# Altium PCB 24V-7A-Power-Board-v1.0.PcbDoc (part 2 of 4)
Units mil, origin at the board's own origin, x right, y up, seen from the top; angles counter-clockwise.
Board outline 6000 x 4000 mil, 2 copper layers (Top Layer, Bottom Layer); 157 components, 80 nets, 383 pads, 0 vias.
Unrouted connection lines stored in the file: 290.
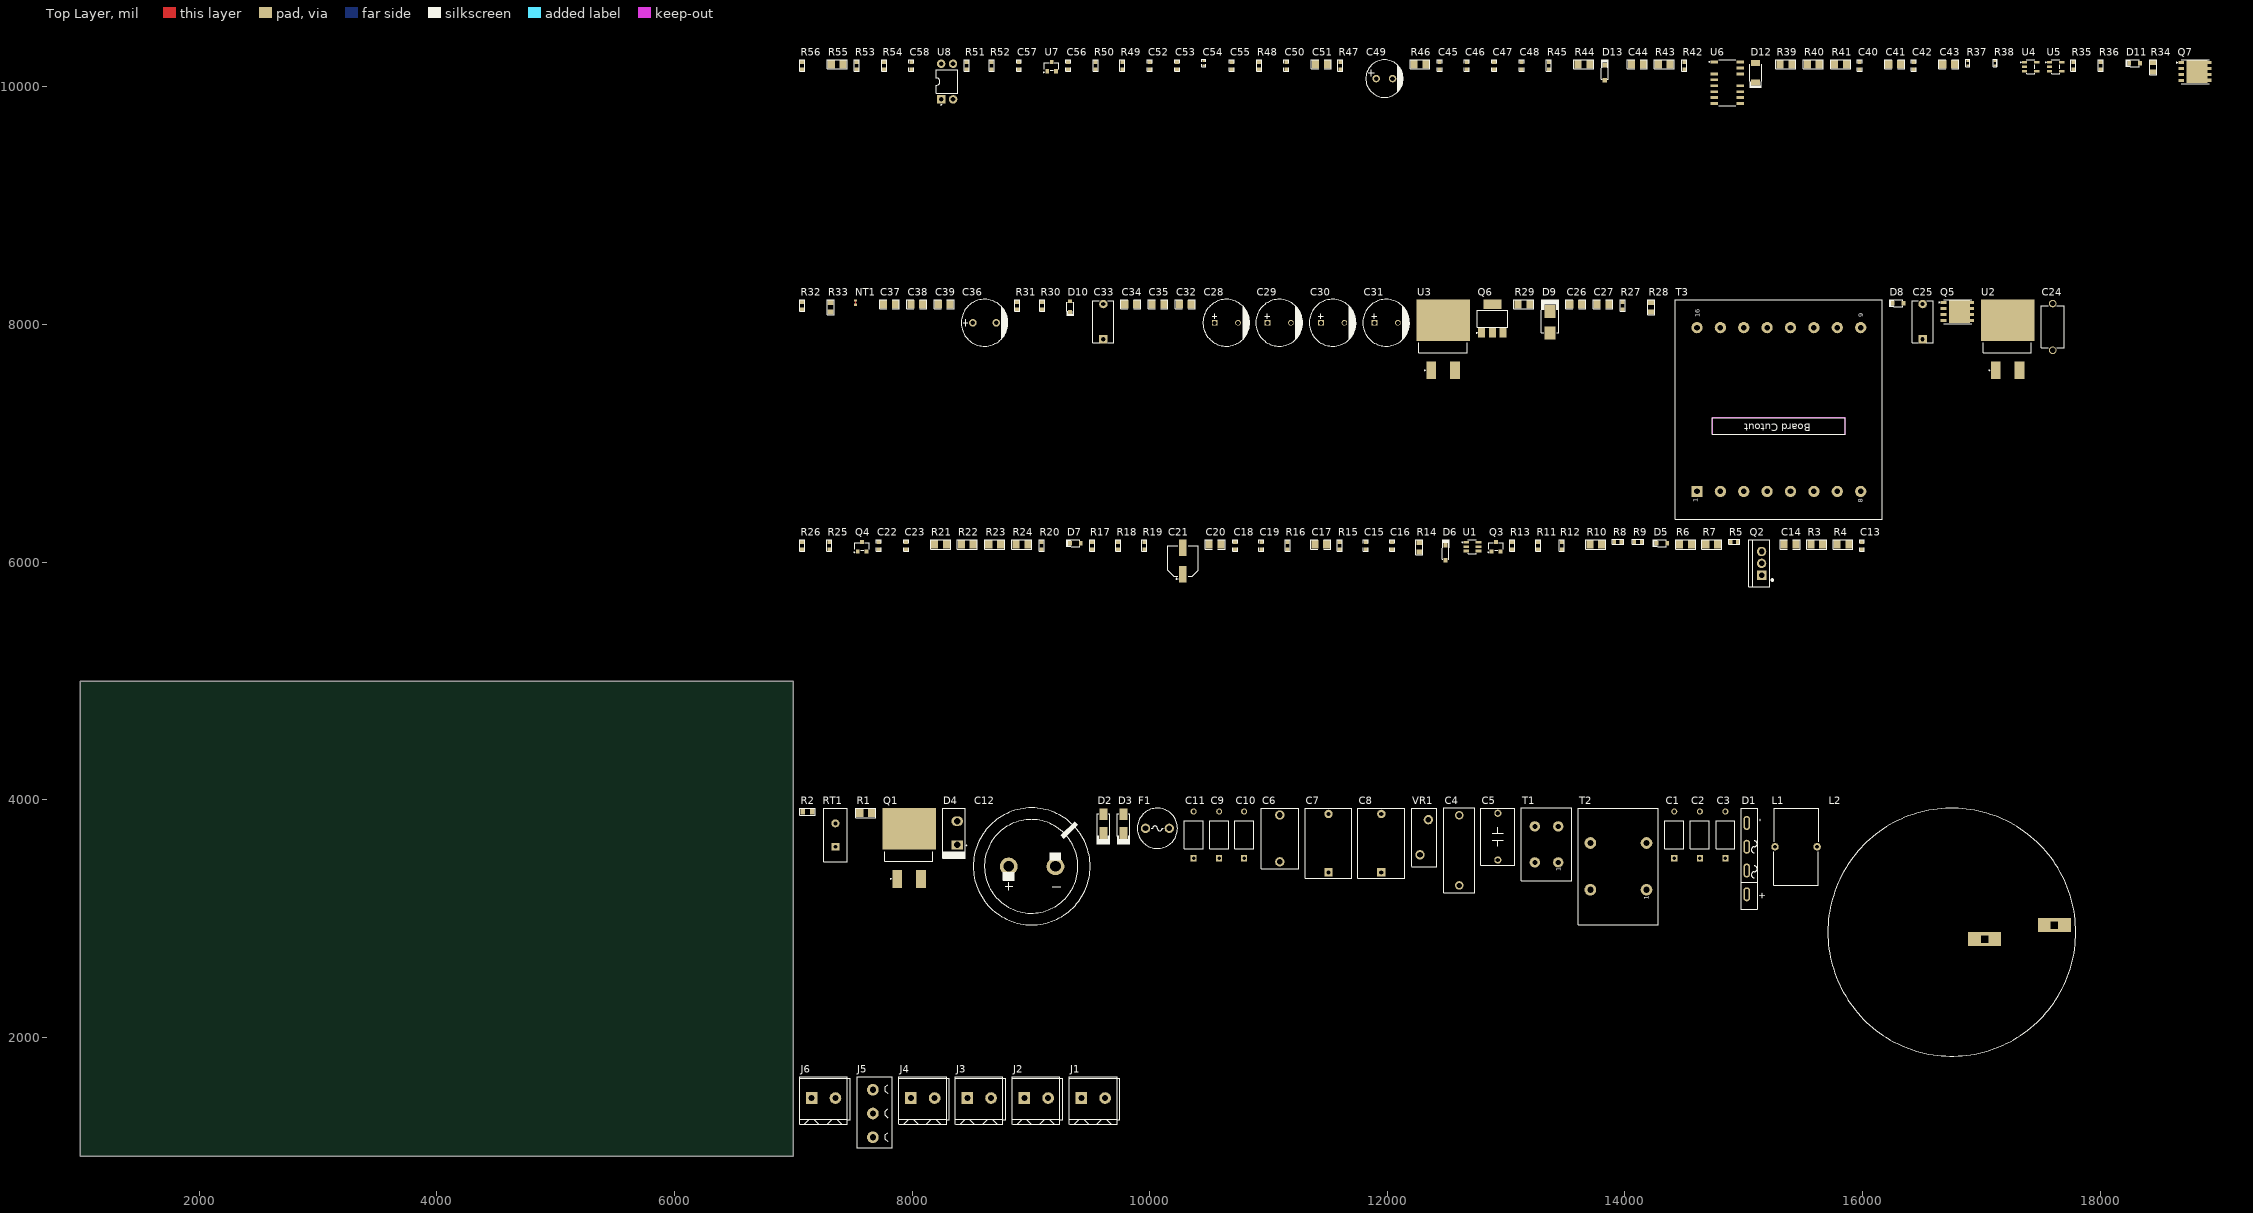
[diagram p0: Top Layer view]

## Part data (continued)
C34: library part GRM31A5C2J151JW01D, "CAP CER 150PF 630V C0G/NP0 1206", LCSC Part Number=C162445, Manufacturer=Murata, ComponentLink1Description=https://datasheet.ciiva.com/138/partnumbering-e-01-138796.pdf?src-supplier=Digikey, ComponentLink1URL=https://datasheet.ciiva.com/138/partnumbering-e-01-138796.pdf?src-supplier=Digikey, ComponentLink2Description=https://datasheet.ciiva.com/138/partnumbering-e-01-138797.pdf?src-supplier=Digikey, ComponentLink2URL=https://datasheet.ciiva.com/138/partnumbering-e-01-138797.pdf?src-supplier=Digikey, ComponentLink3Description=https://datasheet.ciiva.com/138/partnumbering-e-01-138798.pdf?src-supplier=Digikey, ComponentLink3URL=https://datasheet.ciiva.com/138/partnumbering-e-01-138798.pdf?src-supplier=Digikey, ComponentLink4Description=https://datasheet.ciiva.com/13240/c02e-2905-13240518.pdf?src-supplier=Mouser, ComponentLink4URL=https://datasheet.ciiva.com/13240/c02e-2905-13240518.pdf?src-supplier=Mouser, Item Type=Capacitor, Manufacturer Part Number=GRM31A5C2J151JW01D, Pricing="1=0.35, 10=0.194, 50=0.194, 100=0.12, 1000=0.1, 10000=0.08 (USD)", RoHS=Yes, Stock=4361, Supplier=Mouser
C35: library part GRM31A5C3A101JW01D, "CAP CER 100PF 1KV 5% NP0 1206", LCSC Part Number=C162451, Manufacturer=Murata, ComponentLink1Description=https://datasheet.ciiva.com/29535/partnumbering-e-01-29535608.pdf?src-supplier=Digikey, ComponentLink1URL=https://datasheet.ciiva.com/29535/partnumbering-e-01-29535608.pdf?src-supplier=Digikey, ComponentLink2Description=https://datasheet.ciiva.com/7829/1666664-7829029.pdf?src-supplier=Element14, ComponentLink2URL=https://datasheet.ciiva.com/7829/1666664-7829029.pdf?src-supplier=Element14, Item Type=Capacitor, Manufacturer Part Number=GRM31A5C3A101JW01D, Pricing="4000=0.0742, 8000=0.0723, 12000=0.0712, 16000=0.0704, 20000=0.068 (USD)", RoHS=Yes, Stock=4000, Supplier="Future Electronics"
C36: library part EEU-FR1V471B, "CAP ALUM 470UF 20% 35V RADIAL", LCSC Part Number=C713403, Leakage Current=164.5uA, Manufacturer=Panasonic, ComponentLink1Description=https://datasheet.ciiva.com/43469/1653413-43469590.pdf?src-supplier=Farnell, ComponentLink1URL=https://datasheet.ciiva.com/43469/1653413-43469590.pdf?src-supplier=Farnell, ComponentLink2Description=https://datasheet.ciiva.com/11678/aba0000ce132-11678063.pdf?src-supplier=Avnet, ComponentLink2URL=https://datasheet.ciiva.com/11678/aba0000ce132-11678063.pdf?src-supplier=Avnet, ComponentLink3Description=https://datasheet.ciiva.com/46371/1653413-46371772.pdf?src-supplier=Element14, ComponentLink3URL=https://datasheet.ciiva.com/46371/1653413-46371772.pdf?src-supplier=Element14, ComponentLink4Description=https://datasheet.ciiva.com/7805/1725490-7805503.pdf?src-supplier=Element14, ComponentLink4URL=https://datasheet.ciiva.com/7805/1725490-7805503.pdf?src-supplier=Element14, ComponentLink5Description=https://datasheet.ciiva.com/30252/9aba0000ce132-30252342.pdf?src-supplier=Onlinecomponents.com, ComponentLink5URL=https://datasheet.ciiva.com/30252/9aba0000ce132-30252342.pdf?src-supplier=Onlinecomponents.com, ComponentLink6Description=https://datasheet.ciiva.com/16387/aba0000ce132-16387061.pdf?src-supplier=Future+Electronics, ComponentLink6URL=https://datasheet.ciiva.com/16387/aba0000ce132-16387061.pdf?src-supplier=Future+Electronics, ComponentLink7Description=https://datasheet.ciiva.com/14602/70257620-14602201.pdf?src-supplier=Allied+Electronics, ComponentLink7URL=https://datasheet.ciiva.com/14602/70257620-14602201.pdf?src-supplier=Allied+Electronics, ComponentLink8Description=https://datasheet.ciiva.com/29247/448536-da-01-en-alu-kondensator-fr-r-470-uf-35v-500st-29247995.pdf?src-supplier=Conrad, ComponentLink8URL=https://datasheet.ciiva.com/29247/448536-da-01-en-alu-kondensator-fr-r-470-uf-35v-500st-29247995.pdf?src-supplier=Conrad, Item Type=Capacitor, Lead Free=5697LeadFree, Manufacturer Part Number=EEU-FR1V471B, Pins=2NUMBER, Pricing="1=0.78, 10=0.461, 50=0.461, 100=0.375, 1000=0.263, 10000=0.23 (USD)", RoHS=Yes, Stock=21799, Supplier=Mouser
C37: library part CC1206KKX5R9BB225, "CAP CER 2.2UF 50V X5R 1206", Case Code (Imperial)=1206, Case Code (Metric)=3216, Dielectric=X5R, LCSC Part Number=C577210, Manufacturer=Yageo, Max Operating Temperature=85°C, Min Operating Temperature=-55°C, Package Quantity=2000, Tolerance=10%, Voltage Rating=50V, Case/Package=1206, ComponentLink1Description=http://www.mouser.com/ds/2/447/Yageo_UPY-GP_NP0_16V-to-50V_9-358835.pdf?src-supplier=Mouser, ComponentLink1URL=http://www.mouser.com/ds/2/447/Yageo_UPY-GP_NP0_16V-to-50V_9-358835.pdf?src-supplier=Mouser, ComponentLink2Description=http://www.yageo.com/documents/recent/UPY-GPHC_X5R_4V-to-50V_25.pdf?src-supplier=Digikey, ComponentLink2URL=http://www.yageo.com/documents/recent/UPY-GPHC_X5R_4V-to-50V_25.pdf?src-supplier=Digikey, Halogen Free="Halogen Free", Height=1.45mm, Item Type=Capacitor, Lead Free="Lead Free", Length=0.126inch, Manufacturer Part Number=CC1206KKX5R9BB225, Material=4241ConductorMaterial, Mounting Technology="Surface Mount", Packaging="Tape and Reel", Pricing="1=0.59, 10=0.395, 50=0.3144, 100=0.2597, 500=0.20286, 1000=0.17244 (USD)", RoHS=Yes, RoHS Compliant=Yes, Series=CC, Stock=4588, Supplier=Digikey, Termination=SMD/SMT, Thickness=0.071inch, Voltage Rating (DC)=50V, Weight=0.000571oz, Width=0.063inch
C40 C42: library part CC0603KRX5R8BB225, "CAP CER 2.2UF 25V X5R 0603", Case Code (Imperial)=0603, Case Code (Metric)=1608, Dielectric=X5R, LCSC Part Number=C309478, Manufacturer=Yageo, Max Operating Temperature=85°C, Min Operating Temperature=-55°C, Package Quantity=4000, Resistor Type=Ceramic, Supplier Part Number 1=311-1786-1-ND, Tolerance=10%, Voltage Rating=25V, Capacitance=2.2uF, Case/Package=0603, ComponentLink1Description=https://www.verical.com/server-webapp/html/getDatasheet?partID=782757&src-supplier=Verical, ComponentLink1URL=https://www.verical.com/server-webapp/html/getDatasheet?partID=782757&src-supplier=Verical, Depth=0.8mm, Halogen Free="Halogen Free", Item Type=Capacitor, Lead Free="Lead Free", Length=1.6mm, Manufacturer Part Number=CC0603KRX5R8BB225, Mount="Surface Mount", Packaging="Tape and Reel", Pricing 1="1=0.4, 10=0.276, 50=0.1932, 100=0.1656, 500=0.1242, 1000=0.10488 (USD)", Radiation Hardening=No, RoHS Compliant=Yes, Stock 1=687936, Supplier 1=Digi-Key, Termination=SMD/SMT, Thickness=0.037inch, Voltage Rating (DC)=25V, Weight=7.1E-05oz, Width=0.031inch
C44: library part CC1206KKX7R7BB225, "CAP CER 2.2UF 16V X7R 1206", LCSC Part Number=C107183, Manufacturer=Yageo, ComponentLink1Description=https://datasheet.ciiva.com/11788/0900766b80d84f1d-11788402.pdf?src-supplier=Rs, ComponentLink1URL=https://datasheet.ciiva.com/11788/0900766b80d84f1d-11788402.pdf?src-supplier=Rs, ComponentLink2Description=https://datasheet.ciiva.com/11466/upy-gphc-x7r-6-3v-to-50v-8-11466572.pdf?src-supplier=Avnet, ComponentLink2URL=https://datasheet.ciiva.com/11466/upy-gphc-x7r-6-3v-to-50v-8-11466572.pdf?src-supplier=Avnet, ComponentLink3Description=https://datasheet.ciiva.com/5425/upy-gphc-x7r-6-3v-to-50v-8-12304-5425499.pdf?src-supplier=Mouser, ComponentLink3URL=https://datasheet.ciiva.com/5425/upy-gphc-x7r-6-3v-to-50v-8-12304-5425499.pdf?src-supplier=Mouser, Item Type=Capacitors, Manufacturer Part Number=CC1206KKX7R7BB225, Material=4241ConductorMaterial, Pricing="1=0.22, 10=0.144, 50=0.1012, 100=0.0817, 500=0.06072, 1000=0.05312 (USD)", RoHS=Yes, Stock=202610, Supplier=Digikey
C45 C46 C47: library part CC0603KRX5R7BB475, "CAP CER 4.7UF 16V X5R 0603", Case Code (Imperial)=0603, Case Code (Metric)=1608, Dielectric=X5R, LCSC Part Number=C277476, Manufacturer=Yageo, Max Operating Temperature=85°C, Min Operating Temperature=-55°C, Resistor Type=Ceramic, Supplier Part Number 1=311-1785-1-ND, Tolerance=10%, Voltage Rating=16V, Capacitance=4.7uF, Case/Package=0603, Category="Ceramic Capacitors", ComponentLink1Description=http://www.mouser.com/ds/2/447/UPY-GPHC_X5R_4V-to-50V_25-1131599.pdf?src-supplier=Mouser, ComponentLink1URL=http://www.mouser.com/ds/2/447/UPY-GPHC_X5R_4V-to-50V_25-1131599.pdf?src-supplier=Mouser, ComponentLink2Description=http://www.yageo.com/documents/recent/UPY-GPHC_X5R_4V-to-50V_25.pdf?src-supplier=Digi-Key, ComponentLink2URL=http://www.yageo.com/documents/recent/UPY-GPHC_X5R_4V-to-50V_25.pdf?src-supplier=Digi-Key, Depth=0.8mm, Halogen Free="Halogen Free", Height=0.8mm, Item Type=Capacitor, Lead Free="Lead Free", Length=1.6mm, Manufacturer Part Number=CC0603KRX5R7BB475, Mount="Surface Mount", Packaging="Tape and Reel", Pricing 1="1=0.20000, 10=0.13800, 50=0.08280, 100=0.06990, 500=0.04784, 1000=0.04233 (USD)", RoHS=Yes, RoHS Compliant=Yes, Series=CC, Stock 1=547703, Supplier 1=Digi-Key, Termination=SMD/SMT, Thickness=0.037inch, Voltage Rating (DC)=16V, Weight=7.1E-05oz, Width=0.8mm
C48: library part GRM1885C1H103JA01D, "CAP CER 10000PF 50V C0G/NP0 0603", Capacitance=10nF, Case Code (Imperial)=0603, Case Code (Metric)=1608, Dielectric=C0G, Manufacturer=Murata, Max Operating Temperature=125°C, Min Operating Temperature=-55°C, Package Quantity=4000, Supplier Part Number 1=1449032, Tolerance=5%, Voltage=50V, Case/Package=0603, Category="Ceramic Capacitors", ComponentLink1Description=https://datasheet.ciiva.com/41860/partnumbering-e-01-41860759.pdf?src-supplier=Digi-Key, ComponentLink1URL=https://datasheet.ciiva.com/41860/partnumbering-e-01-41860759.pdf?src-supplier=Digi-Key, ComponentLink2Description=https://datasheet.ciiva.com/29537/partnumbering-e-01-29537910.pdf?src-supplier=Digi-Key, ComponentLink2URL=https://datasheet.ciiva.com/29537/partnumbering-e-01-29537910.pdf?src-supplier=Digi-Key, Depth=0.8mm, Height=0.8mm, Lead Free="Lead Free", Lead Pitch=0.5mm, Length=1.6mm, Manufacturer Part Number=GRM1885C1H103JA01D, Material=Ceramic, Mount="Surface Mount", Packaging="Tape and Reel", Pricing 1="4000=0.03500, 8000=0.03200 (GBP)", REACH SVHC="No SVHC", RoHS=Yes, RoHS Compliant=Yes, Series=GRM, Stock 1=80000, Supplier 1=RSComponents, Termination=SMD/SMT, Thickness=0.035inch, Voltage Rating=50V, Voltage Rating (DC)=50V, Width=0.8mm
C49: library part RC035M331LO8*14TH-2A1E, "330uF 35V ±20% 860mA@100kHz Plugin,D8xL14mm Aluminum Electrolytic Capacitors - Leaded ROHS", LCSC Part Number=C357626, Manufacturer="BERYL Electronic Tech", Package=Plugin,D8xL14mm, ComponentLink1Description=LCSC, ComponentLink1URL=https://www.lcsc.com/product-detail/Aluminum-Electrolytic-Capacitors-Leaded_BERYL-Electronic-Tech-RC035M331LO8-14TH-2A1E_C357626.html, Item Type=Capacitor, Manufacturer Part Number=RC035M331LO8*14TH-2A1E
C50: library part GRM188R6YA225KA12D, "CAP, 2.2µF, 35V, 10%, X5R, 0603", Case Code (Imperial)=0603, Case Code (Metric)=1608, Dielectric=X5R, LCSC Part Number=C86017, Manufacturer=Murata, Max Operating Temperature=85°C, Min Operating Temperature=-55°C, Package Quantity=4000, Supplier Part Number 1=490-7204-1-ND, Tolerance=10%, Voltage=35V, Capacitance=2.2uF, Case/Package=0603, Category="Ceramic Capacitors", ComponentLink1Description=https://datasheet.ciiva.com/14906/partnumbering-e-01-14906490.pdf?src-supplier=Digi-Key, ComponentLink1URL=https://datasheet.ciiva.com/14906/partnumbering-e-01-14906490.pdf?src-supplier=Digi-Key, ComponentLink2Description=https://datasheet.ciiva.com/14906/partnumbering-e-01-14906491.pdf?src-supplier=Digi-Key, ComponentLink2URL=https://datasheet.ciiva.com/14906/partnumbering-e-01-14906491.pdf?src-supplier=Digi-Key, ComponentLink3Description=https://datasheet.ciiva.com/14906/partnumbering-e-01-14906492.pdf?src-supplier=Digi-Key, ComponentLink3URL=https://datasheet.ciiva.com/14906/partnumbering-e-01-14906492.pdf?src-supplier=Digi-Key, Depth=0.8mm, Height=0.8mm, Item Type=Capacitor, Lead Free="Lead Free", Length=1.6mm, Manufacturer Part Number=GRM188R6YA225KA12D, Material=Ceramic, Mount="Surface Mount", Packaging="Tape and Reel", Pricing 1="1=0.21000, 10=0.14100, 50=0.08480, 100=0.07170, 500=0.04904, 1000=0.04338 (USD)", REACH SVHC="No SVHC", RoHS=Yes, RoHS Compliant=Yes, Series=GRM, Stock 1=81665, Supplier 1=Digi-Key, Termination=SMD/SMT, Thickness=0.035inch, Voltage Rating=35V, Voltage Rating (DC)=35V, Weight=0.000222oz, Width=0.8mm
C51: library part GRM31CR72A105KA01K, "CAP CER 1UF 100V X7R 1206", Case Code (Imperial)=1206, Case Code (Metric)=3216, Dielectric=X7R, LCSC Part Number=C909823, Manufacturer=Murata, Max Operating Temperature=125°C, Min Operating Temperature=-55°C, Package Quantity=1, Supplier Part Number 1=490-6523-1-ND, Tolerance=10%, Voltage Rating=100V, Capacitance=1uF, Case/Package=1206, Category="Ceramic Capacitors", ComponentLink1Description=https://datasheet.ciiva.com/11616/product-11616604.pdf?src-supplier=Avnet, ComponentLink1URL=https://datasheet.ciiva.com/11616/product-11616604.pdf?src-supplier=Avnet, ComponentLink2Description=https://datasheet.ciiva.com/6264/partnumbering-e-01-6264397.pdf?src-supplier=Digi-Key, ComponentLink2URL=https://datasheet.ciiva.com/6264/partnumbering-e-01-6264397.pdf?src-supplier=Digi-Key, ComponentLink3Description=https://datasheet.ciiva.com/6264/partnumbering-e-01-6264398.pdf?src-supplier=Digi-Key, ComponentLink3URL=https://datasheet.ciiva.com/6264/partnumbering-e-01-6264398.pdf?src-supplier=Digi-Key, ComponentLink4Description=https://datasheet.ciiva.com/6264/partnumbering-e-01-6264399.pdf?src-supplier=Digi-Key, ComponentLink4URL=https://datasheet.ciiva.com/6264/partnumbering-e-01-6264399.pdf?src-supplier=Digi-Key, Construction=Flat, Depth=1.6mm, Height=1.6mm, Length=3.2mm, Manufacturer Part Number=GRM31CR72A105KA01K, Mount="Surface Mount", Packaging="Tape and Reel", Pricing 1="1=0.48000, 10=0.33000, 50=0.23100, 100=0.19800, 500=0.14850, 1000=0.12540, 2500=0.11880 (USD)", Radiation Hardening=No, RoHS=Yes, RoHS Compliant=Yes, Series=GRM, Stock 1=11842, Supplier 1=Digi-Key, Termination=SMD/SMT, Thickness=0.071inch, Voltage Rating (DC)=100V, Width=1.6mm
C52: library part CS1608X7R221K500NRB, "50V 220pF X7R ±10% 0603 Multilayer Ceramic Capacitors MLCC - SMD/SMT ROHS", LCSC Part Number=C5255295, Manufacturer="Samwha Capacitors", Package=0603, ComponentLink1Description=LCSC, ComponentLink1URL=https://www.lcsc.com/product-detail/Multilayer-Ceramic-Capacitors-MLCC-SMD-SMT_Samwha-Capacitor-CS1608X7R221K500NRB_C5255295.html, Item Type=Capacitor, Manufacturer Part Number=CS1608X7R221K500NRB
C53: library part 06031C103KAT2A, "CAP CER 10000PF 100V X7R 0603", Case Code (Imperial)=0603, Case Code (Metric)=1608, Dielectric=X7R, Insulation Resistance=100GR, LCSC Part Number=C2167322, Manufacturer="Kyocera AVX", Max Operating Temperature=125°C, Min Operating Temperature=-55°C, Package Quantity=4000, Tolerance=10%, Voltage=100V, Case/Package=0603, ComponentLink1Description=https://datasheet.ciiva.com/11788/0900766b80dc2409-11788544.pdf?src-supplier=Rs, ComponentLink1URL=https://datasheet.ciiva.com/11788/0900766b80dc2409-11788544.pdf?src-supplier=Rs, ComponentLink2Description=https://datasheet.ciiva.com/1124/1679506-1124248.pdf?src-supplier=Element14, ComponentLink2URL=https://datasheet.ciiva.com/1124/1679506-1124248.pdf?src-supplier=Element14, ComponentLink3Description=https://datasheet.ciiva.com/152/cx7r-152476.pdf?src-supplier=Digikey, ComponentLink3URL=https://datasheet.ciiva.com/152/cx7r-152476.pdf?src-supplier=Digikey, ComponentLink4Description=https://datasheet.ciiva.com/2987/cx7r-2987736.pdf?src-supplier=Avnet, ComponentLink4URL=https://datasheet.ciiva.com/2987/cx7r-2987736.pdf?src-supplier=Avnet, ComponentLink5Description=https://datasheet.ciiva.com/1124/1679506-1124247.pdf?src-supplier=Element14, ComponentLink5URL=https://datasheet.ciiva.com/1124/1679506-1124247.pdf?src-supplier=Element14, ComponentLink6Description=https://datasheet.ciiva.com/7855/1679506-7855035.pdf?src-supplier=Element14, ComponentLink6URL=https://datasheet.ciiva.com/7855/1679506-7855035.pdf?src-supplier=Element14, ComponentLink7Description=https://datasheet.ciiva.com/152/cx7r-152475.pdf?src-supplier=Digikey, ComponentLink7URL=https://datasheet.ciiva.com/152/cx7r-152475.pdf?src-supplier=Digikey, ComponentLink8Description=https://datasheet.ciiva.com/152/cx7r-152477.pdf?src-supplier=Digikey, ComponentLink8URL=https://datasheet.ciiva.com/152/cx7r-152477.pdf?src-supplier=Digikey, ComponentLink9Description=https://datasheet.ciiva.com/5411/cx7r-5411278.pdf?src-supplier=Mouser, ComponentLink9URL=https://datasheet.ciiva.com/5411/cx7r-5411278.pdf?src-supplier=Mouser, ComponentLink10Description=https://datasheet.ciiva.com/14590/70001075-14590198.pdf?src-supplier=Allied+Electronics, ComponentLink10URL=https://datasheet.ciiva.com/14590/70001075-14590198.pdf?src-supplier=Allied+Electronics, Construction=Flat, Depth=0.81mm, Dissipation Factor=2.5%, Height=0.9mm, Item Type=Capacitors, Lead Free="Lead Free", Length=1.6mm, Manufacturer Part Number=06031C103KAT2A, Material=4241ConductorMaterial, Mounting Technology="Surface Mount,PCB", Packaging="Tape and Reel", Pins=2, Pricing="4000=0.05033 (USD)", Reach SVHC Compliant=No, RoHS=Yes, RoHS Compliant=Yes, Series=-, Stock=512000, Supplier=Avnet, Termination=SMD/SMT, Thickness=0.034inch, Voltage Rating=100V, Voltage Rating (AC)=100V, Voltage Rating (DC)=100V, Width=0.006inch
C54: library part GCM1555C1H470FA16D, "CAP CER 47PF 50V C0G/NP0 0402", Case Code (Imperial)=0402, Case Code (Metric)=1005, LCSC Part Number=C393684, Manufacturer=Murata, Max Operating Temperature=125°C, Min Operating Temperature=-55°C, Ratings=AEC-Q200, Supplier Part Number 1=490-16445-1-ND, Tolerance=1%, Voltage Rating=50V, Capacitance=47pF, Case/Package=0402, Category="Ceramic Capacitors", ComponentLink1Description=http://search.murata.co.jp/Ceramy/image/img/A01X/G101/ENG/GCM1555C1H470FA16-01.pdf?src-supplier=Digi-Key, ComponentLink1URL=http://search.murata.co.jp/Ceramy/image/img/A01X/G101/ENG/GCM1555C1H470FA16-01.pdf?src-supplier=Digi-Key, Manufacturer Part Number=GCM1555C1H470FA16D, Mount="Surface Mount", Packaging="Tape and Reel", Pricing 1="1=0.11000, 10=0.07900, 50=0.04500, 100=0.03730, 500=0.02618, 1000=0.02168, 2500=0.02018, 5000=0.01846 (USD)", RoHS=No, Stock 1=27098, Supplier 1=Digi-Key
C55: library part CC0603KRX7R9BB823, "CAP CER 0.082UF 50V X7R 0603", Case Code (Imperial)=0603, Case Code (Metric)=1608, Dielectric=X7R, LCSC Part Number=C107100, Manufacturer=Yageo, Max Operating Temperature=125°C, Min Operating Temperature=-55°C, Resistor Type=Ceramic, Supplier Part Number 1=69AH7269, Tolerance=10%, Voltage Rating=50V, Capacitance=82nF, Case/Package=0603, Category="Ceramic Capacitors", ComponentLink1Description=https://datasheet.ciiva.com/13264/upy-gphc-x7r-6-3v-to-50v-8-12304-13264057.pdf?src-supplier=Mouser, ComponentLink1URL=https://datasheet.ciiva.com/13264/upy-gphc-x7r-6-3v-to-50v-8-12304-13264057.pdf?src-supplier=Mouser, Depth=0.8mm, Halogen Free="Halogen Free", Lead Free="Lead Free", Length=1.6mm, Manufacturer Part Number=CC0603KRX7R9BB823, Mount="Surface Mount", Packaging="Tape and Reel", Pricing 1="1=0.01500, 4000=0.01400, 8000=0.01400 (USD)", Radiation Hardening=No, RoHS=Yes, RoHS Compliant=Yes, Series=CC, Stock 1=40000, Supplier 1=Newark, Termination=SMD/SMT, Thickness=0.035inch, Voltage Rating (DC)=50V, Weight=7.1E-05oz, Width=0.031inch
C56: library part CC0603KRX7R0BB472, "CAP CER 4700PF 100V X7R 0603", Dielectric Material=4241ConductorMaterial, LCSC Part Number=C115052, Manufacturer=Yageo, Voltage Rating (AC)=100V, ComponentLink1Description=https://datasheet.ciiva.com/8033/1669968-8033781.pdf?src-supplier=Element14, ComponentLink1URL=https://datasheet.ciiva.com/8033/1669968-8033781.pdf?src-supplier=Element14, Item Type=Capacitor, Lead Free=5697LeadFree, Manufacturer Part Number=CC0603KRX7R0BB472, Pricing="1=0.1, 10=0.05, 50=0.0288, 100=0.0223, 500=0.0168, 1000=0.01319 (USD)", RoHS=Yes, Stock=67499, Supplier=Digikey
C57: library part CC0603KPX7R9BB471, "CAP CER 470PF 50V X7R 0603", Case Code (Imperial)=0603, Case Code (Metric)=1608, Dielectric=X7R, LCSC Part Number=C2184946, Manufacturer=Yageo, Max Operating Temperature=125°C, Min Operating Temperature=-55°C, Resistor Type=Ceramic, Supplier Part Number 1=13-CC0603KPX7R9BB471CT-ND, Tolerance=10%, Voltage Rating (DC)=50V, Capacitance=470pF, Case/Package=0603, Category="Ceramic Capacitors", ComponentLink1Description=https://datasheet.ciiva.com/17436/upy-gphc-x7r-6-3v-to-50v-8-17436926.pdf?src-supplier=Avnet+Europe, ComponentLink1URL=https://datasheet.ciiva.com/17436/upy-gphc-x7r-6-3v-to-50v-8-17436926.pdf?src-supplier=Avnet+Europe, Construction=Flat, Depth=0.8mm, Halogen Free="Halogen Free", Height=0.8mm, Lead Free="Lead Free", Length=1.6mm, Manufacturer Part Number=CC0603KPX7R9BB471, Mount="Surface Mount", Packaging="Tape and Reel", Pricing 1="1=0.10000, 10=0.04700, 50=0.02560, 100=0.02100, 500=0.01498, 1000=0.01176, 2500=0.01070, 5000=0.00984 (USD)", Radiation Hardening=No, RoHS=Yes, RoHS Compliant=Yes, Stock 1=29788, Supplier 1=Digi-Key, Termination=SMD/SMT, Weight=7.1E-05oz
C58: library part CC0603FRNPO9BN470, "CAP CER 47PF 50V NPO 0603", LCSC Part Number=C519486, Manufacturer=Yageo, ComponentLink1Description=https://datasheet.ciiva.com/5425/upy-gp-np0-16v-to-50v-8-5425545.pdf?src-supplier=Mouser, ComponentLink1URL=https://datasheet.ciiva.com/5425/upy-gp-np0-16v-to-50v-8-5425545.pdf?src-supplier=Mouser, ComponentLink2Description=https://datasheet.ciiva.com/11586/upy-gp-np0-16v-to-50v-8-11586472.pdf?src-supplier=Avnet, ComponentLink2URL=https://datasheet.ciiva.com/11586/upy-gp-np0-16v-to-50v-8-11586472.pdf?src-supplier=Avnet, Item Type=Capacitor, Manufacturer Part Number=CC0603FRNPO9BN470, Pricing="1=0.19, 10=0.126, 50=0.0756, 100=0.0594, 500=0.0439, 1000=0.03634 (USD)", RoHS=Yes, Stock=37282, Supplier=Digikey
D1: "BRIDGE RECT 1PHASE 600V 8A GBU", LCSC Part Number=C150753, Manufacturer=Diodes, ComponentLink1Description=https://datasheet.ciiva.com/27052/1540404-27052400.pdf?src-supplier=Jameco, ComponentLink1URL=https://datasheet.ciiva.com/27052/1540404-27052400.pdf?src-supplier=Jameco, ComponentLink2Description=https://datasheet.ciiva.com/16206/ds21227-16206956.pdf?src-supplier=Future+Electronics, ComponentLink2URL=https://datasheet.ciiva.com/16206/ds21227-16206956.pdf?src-supplier=Future+Electronics, ComponentLink3Description=https://datasheet.ciiva.com/15145/getdatasheetpartid-157294-15145339.pdf?src-supplier=Verical, ComponentLink3URL=https://datasheet.ciiva.com/15145/getdatasheetpartid-157294-15145339.pdf?src-supplier=Verical, ComponentLink4Description=https://datasheet.ciiva.com/885/ds21227-885908.pdf?src-supplier=Digikey, ComponentLink4URL=https://datasheet.ciiva.com/885/ds21227-885908.pdf?src-supplier=Digikey, ComponentLink5Description=https://datasheet.ciiva.com/11195/ds21227-11195657.pdf?src-supplier=Avnet, ComponentLink5URL=https://datasheet.ciiva.com/11195/ds21227-11195657.pdf?src-supplier=Avnet, Item Type=Diode, Manufacturer Part Number=GBU806, Pricing="20=0.565, 100=0.54, 500=0.51, 1000=0.5, 3000=0.465 (USD)", RoHS=Yes, Stock=174414, Supplier="Future Electronics"
D2 D3: "DIODE GEN PURP 600V 1A SMA", Average Rectified Current=2A, Case/Package=SMA, Forward Voltage=1.25V, LCSC Part Number=C50432, Manufacturer="ON Semiconductor", Max Forward Surge Current (Ifsm)=30A, Max Operating Temperature=175°C, Max Repetitive Reverse Voltage (Vrrm)=600V, Max Reverse Current=5uA, Min Operating Temperature=-65°C, Output Current=1A, Package Quantity=1, ComponentLink1Description=https://datasheet.ciiva.com/8293/mura160t3-d-8293035.pdf?src-supplier=Avnet, ComponentLink1URL=https://datasheet.ciiva.com/8293/mura160t3-d-8293035.pdf?src-supplier=Avnet, ComponentLink2Description=https://datasheet.ciiva.com/27056/2015775-27056224.pdf?src-supplier=Jameco, ComponentLink2URL=https://datasheet.ciiva.com/27056/2015775-27056224.pdf?src-supplier=Jameco, ComponentLink3Description=https://datasheet.ciiva.com/16395/mura160t3-d-16395990.pdf?src-supplier=Future+Electronics, ComponentLink3URL=https://datasheet.ciiva.com/16395/mura160t3-d-16395990.pdf?src-supplier=Future+Electronics, Current Rating=2A, Forward Current=2A, Halogen Free="Halogen Free", Height=2mm, Item Type=Diode, Lead Free="Lead Free", Length=4.32mm, Manufacturer Part Number=MURA160T3G, Max Reverse Voltage (DC)=600V, Max Surge Current=30A, Packaging="Tape and Reel", Peak Non-Repetitive Surge Current=30A, Pins=2, Polarity=Standard, Pricing="5000=0.109, 10000=0.106, 15000=0.104, 20000=0.103, 25000=0.0996 (USD)", Radiation Hardening=No, Reach SVHC Compliant=No, Recovery Time=75ns, Reverse Recovery Time=75ns, Reverse Recovery Time-Max=75ns, Reverse Voltage=600V, RoHS=Yes, RoHS Compliant=Yes, Series=-, Stock=190000, Supplier="Future Electronics", Voltage Rating (DC)=600V, Width=2.6mm
D4: "DIODE GEN PURP 600V 8A TO220FPAC", LCSC Part Number=C77956, Manufacturer=STMicroelectronics, ComponentLink1Description=https://datasheet.ciiva.com/4455/cd00002721-110256-4455363.pdf?src-supplier=Mouser, ComponentLink1URL=https://datasheet.ciiva.com/4455/cd00002721-110256-4455363.pdf?src-supplier=Mouser, ComponentLink2Description=https://datasheet.ciiva.com/7964/1522573-7964086.pdf?src-supplier=Element14, ComponentLink2URL=https://datasheet.ciiva.com/7964/1522573-7964086.pdf?src-supplier=Element14, ComponentLink3Description=https://datasheet.ciiva.com/917/cd00002721-917751.pdf?src-supplier=Digikey, ComponentLink3URL=https://datasheet.ciiva.com/917/cd00002721-917751.pdf?src-supplier=Digikey, ComponentLink4Description=https://datasheet.ciiva.com/14169/cd00002721-14169005.pdf?src-supplier=Distrelec, ComponentLink4URL=https://datasheet.ciiva.com/14169/cd00002721-14169005.pdf?src-supplier=Distrelec, Item Type=Diode, Manufacturer Part Number=STTH8L06FP, Pricing="1=0.8, 10=0.793, 50=0.793, 100=0.793, 1000=0.673, 10000=0.377 (USD)", RoHS=Yes, Stock=2675, Supplier=Mouser
D5 D7 D8 D10: "100V 1V@10mA 4ns 200mA SOD-323 Switching Diodes ROHS", LCSC Part Number=C668970, Manufacturer=MCC, ComponentLink1Description=https://datasheet.ciiva.com/6367/mmdl914sod-323-6367364.pdf?src-supplier=Digikey, ComponentLink1URL=https://datasheet.ciiva.com/6367/mmdl914sod-323-6367364.pdf?src-supplier=Digikey, ComponentLink2Description=https://datasheet.ciiva.com/24097/mmdl914sod-323-24097719.pdf?src-supplier=Mouser, ComponentLink2URL=https://datasheet.ciiva.com/24097/mmdl914sod-323-24097719.pdf?src-supplier=Mouser, ComponentLink3Description=https://datasheet.ciiva.com/6367/mmdl914sod-323-6367366.pdf?src-supplier=Digikey, ComponentLink3URL=https://datasheet.ciiva.com/6367/mmdl914sod-323-6367366.pdf?src-supplier=Digikey, ComponentLink4Description=https://datasheet.ciiva.com/6367/mmdl914sod-323-6367368.pdf?src-supplier=Digikey, ComponentLink4URL=https://datasheet.ciiva.com/6367/mmdl914sod-323-6367368.pdf?src-supplier=Digikey, Item Type=Diode, Manufacturer Part Number=MMDL914-TP, Pricing="1=0.15, 10=0.108, 100=0.0585, 500=0.04594, 1000=0.03191 (USD)", RoHS=Yes, Stock=172971, Supplier=Digikey
D6: "100V 400mW Single 1.25V@150mA 8ns 300mA SOD-123 Switching Diode ROHS", LCSC Part Number=C917030, Manufacturer=JSMSEMI, Package=SOD-123, ComponentLink1Description=LCSC, ComponentLink1URL=https://www.lcsc.com/product-detail/Switching-Diode_JSMSEMI-1N4148W_C917030.html, Item Type=Diode, Manufacturer Part Number=1N4148W
D9: "DIODE SCHOTTKY 60V 1A SMB", Average Rectified Current=1A, Case/Package=SMB, LCSC Part Number=C5268303, Manufacturer=STMicroelectronics, Max Reverse Voltage (DC)=60V, Package Quantity=1, ComponentLink1Description=https://datasheet.ciiva.com/6380/dm00058656-6380741.pdf?src-supplier=Digikey, ComponentLink1URL=https://datasheet.ciiva.com/6380/dm00058656-6380741.pdf?src-supplier=Digikey, Item Type=Diode, Manufacturer Part Number=STPS160UY, Mounting Technology="Surface Mount", Packaging="Tape and Reel", Pricing="1=0.46, 10=0.458, 50=0.458, 100=0.458, 1000=0.314, 10000=0.107 (USD)", RoHS=Yes, RoHS Compliant=Yes, Series=-, Stock=2181, Supplier=Mouser
D11: "19V~21V 200mW 20V SOD-323-2 Zener Diodes ROHS", LCSC Part Number=C508233, Manufacturer=Diodes, ComponentLink1Description=https://datasheet.ciiva.com/896/ds31038-896169.pdf?src-supplier=Digikey, ComponentLink1URL=https://datasheet.ciiva.com/896/ds31038-896169.pdf?src-supplier=Digikey, ComponentLink2Description=https://datasheet.ciiva.com/896/ds31038-896170.pdf?src-supplier=Digikey, ComponentLink2URL=https://datasheet.ciiva.com/896/ds31038-896170.pdf?src-supplier=Digikey, ComponentLink3Description=https://datasheet.ciiva.com/896/ds31038-896171.pdf?src-supplier=Digikey, ComponentLink3URL=https://datasheet.ciiva.com/896/ds31038-896171.pdf?src-supplier=Digikey, ComponentLink4Description=https://datasheet.ciiva.com/10640/ds31038-10640197.pdf?src-supplier=Avnet, ComponentLink4URL=https://datasheet.ciiva.com/10640/ds31038-10640197.pdf?src-supplier=Avnet, Item Type=Diode, Manufacturer Part Number=MMSZ5250BS-7-F, Pricing="3000=0.0292, 9000=0.0281, 15000=0.0276, 60000=0.0263, 90000=0.0255 (USD)", RoHS=Yes, Stock=3000, Supplier="Future Electronics"
D12: "DIODE GEN PURP 600V 1A DO214AD", Forward Current=1A, LCSC Part Number=C896698, Manufacturer="ON Semiconductor / Fairchild", Max Reverse Current=1uA, Reverse Voltage=600V, ComponentLink1Description=http://www.farnell.com/datasheets/2572314.pdf?src-supplier=Farnell, ComponentLink1URL=http://www.farnell.com/datasheets/2572314.pdf?src-supplier=Farnell, ComponentLink2Description=http://www.farnell.com/datasheets/2572314.pdf?src-supplier=Newark, ComponentLink2URL=http://www.farnell.com/datasheets/2572314.pdf?src-supplier=Newark, ComponentLink3Description=http://www.farnell.com/datasheets/2572314.pdf?src-supplier=Element14, ComponentLink3URL=http://www.farnell.com/datasheets/2572314.pdf?src-supplier=Element14, ComponentLink4Description=https://www.onsemi.com/pub/Collateral/ES1JAF-D.PDF?src-supplier=Digikey, ComponentLink4URL=https://www.onsemi.com/pub/Collateral/ES1JAF-D.PDF?src-supplier=Digikey, ComponentLink5Description=https://www.fairchildsemi.com/datasheets/ES/ES1DAF.pdf?src-supplier=Digikey, ComponentLink5URL=https://www.fairchildsemi.com/datasheets/ES/ES1DAF.pdf?src-supplier=Digikey, Height=1.1mm, Item Type=Diode, Manufacturer Part Number=ES1JAF, Pricing="1=0.66, 10=0.443, 100=0.3026, 500=0.23836, 1000=0.21716, 2000=0.19913, 5000=0.17939 (USD)", RoHS=Yes, Stock=35994, Supplier=Digikey
D13: "DIODE GEN PURP 100V 300MA SOD123", Average Rectified Current=300mA, Current Rating=150mA, Forward Voltage=1.25V, LCSC Part Number=C83528, Manufacturer=Diodes, Max Forward Surge Current (Ifsm)=2A, Max Operating Temperature=150°C, Max Repetitive Reverse Voltage (Vrrm)=100V, Max Reverse Current=1uA, Min Operating Temperature=-65°C, Package Quantity=3000, Power Dissipation=400mW, Supplier Part Number 1=7634694, Voltage Rating (DC)=75V, Category="Rectifier Diodes", ComponentLink1Description=https://datasheet.ciiva.com/1179/1915529-1179304.pdf?src-supplier=Element14, ComponentLink1URL=https://datasheet.ciiva.com/1179/1915529-1179304.pdf?src-supplier=Element14, ComponentLink2Description=https://datasheet.ciiva.com/22695/1915529-22695239.pdf?src-supplier=Element14, ComponentLink2URL=https://datasheet.ciiva.com/22695/1915529-22695239.pdf?src-supplier=Element14, ComponentLink3Description=https://datasheet.ciiva.com/8300/ds30086-8300392.pdf?src-supplier=Avnet, ComponentLink3URL=https://datasheet.ciiva.com/8300/ds30086-8300392.pdf?src-supplier=Avnet, ComponentLink4Description=https://datasheet.ciiva.com/15219/getdatasheetpartid-110030-15219548.pdf?src-supplier=Verical, ComponentLink4URL=https://datasheet.ciiva.com/15219/getdatasheetpartid-110030-15219548.pdf?src-supplier=Verical, ComponentLink5Description=https://datasheet.ciiva.com/8303/ds30086-8303197.pdf?src-supplier=Avnet, ComponentLink5URL=https://datasheet.ciiva.com/8303/ds30086-8303197.pdf?src-supplier=Avnet, ComponentLink6Description=https://datasheet.ciiva.com/911/ds30086-911735.pdf?src-supplier=Digi-Key, ComponentLink6URL=https://datasheet.ciiva.com/911/ds30086-911735.pdf?src-supplier=Digi-Key, ComponentLink7Description=https://datasheet.ciiva.com/911/ds30086-911736.pdf?src-supplier=Digi-Key, ComponentLink7URL=https://datasheet.ciiva.com/911/ds30086-911736.pdf?src-supplier=Digi-Key, ComponentLink8Description=https://datasheet.ciiva.com/911/ds30086-911734.pdf?src-supplier=Digi-Key, ComponentLink8URL=https://datasheet.ciiva.com/911/ds30086-911734.pdf?src-supplier=Digi-Key, ComponentLink9Description=https://datasheet.ciiva.com/4435/ds30086-4435128.pdf?src-supplier=Mouser, ComponentLink9URL=https://datasheet.ciiva.com/4435/ds30086-4435128.pdf?src-supplier=Mouser, Contact Plating=Tin,Matte, Element Configuration=Single, Forward Current=150mA, Height=1.25mm, Item Type=Diode, Lead Free="Lead Free", Length=2.85mm, Manufacturer Part Number=1N4148W-7-F, Max Reverse Voltage (DC)=100V, Max Surge Current=2A, Mounting Technology="Surface Mount", Output Current=150mA, Packaging="Tape and Reel", Peak Non-Repetitive Surge Current=2A, Pins=2, Polarity=Standard, Power Rating=400mW, Pricing 1="3000=0.01840, 12000=0.01760, 45000=0.01690, 120000=0.01640, 300000=0.01560 (USD)", Radiation Hardening=No, Reach SVHC Compliant=Yes, Recovery Time=4ns, Reverse Recovery Time=4ns, Reverse Recovery Time-Max=4ns, RoHS=Yes, RoHS Compliant=Yes, Series=-, Stock 1=32931000, Supplier 1="Future Electronics", Voltage=100V, Weight=0.000353oz, Width=1.7mm
F1: library part 37215000001, "FUSE BOARD MNT 5A 250VAC RADIAL", LCSC Part Number=C142820, Manufacturer="Littelfuse Wickmann", ComponentLink1Description=https://datasheet.ciiva.com/299/littelfuse-fuse-372-299190.pdf?src-supplier=Digikey, ComponentLink1URL=https://datasheet.ciiva.com/299/littelfuse-fuse-372-299190.pdf?src-supplier=Digikey, ComponentLink2Description=https://datasheet.ciiva.com/16298/littelfuse-fuse-372-16298798.pdf?src-supplier=Future+Electronics, ComponentLink2URL=https://datasheet.ciiva.com/16298/littelfuse-fuse-372-16298798.pdf?src-supplier=Future+Electronics, Item Type=Fuses, Manufacturer Part Number=37215000001, Pricing="1=0.96, 5=0.928, 10=0.869, 50=0.7192, 100=0.5993, 250=0.58436, 500=0.49446 (USD)", RoHS=Yes, Stock=2122, Supplier=Digikey
J1 J2 J3 J4 J6: "1x2P 5.08mm 2.5 1 2 18A -40℃~+105℃ 250V Green 14~30 Direct Insert Plugin,P=5.08mm Screw Terminal Blocks ROHS", LCSC Part Number=C8465, Manufacturer=Kangnex, Item Type="Terminal Block", Manufacturer Part Number=WJ500V-5.08-2P, RoHS=No
J5: "1x3P 18A -40℃~+105℃ 250V Green 14~30 Straight pin 5.08mm 2.5 1 3 Plugin,P=5.08mm Screw terminal ROHS", LCSC Part Number=C72334, Manufacturer="Ningbo Kangnex Elec", Package=Plugin,P=5.08mm, ComponentLink1Description=LCSC, ComponentLink1URL=https://www.lcsc.com/product-detail/Screw-terminal_Ningbo-Kangnex-Elec-WJ500V-5-08-3P_C72334.html, Item Type="Terminal Block", Manufacturer Part Number=WJ500V-5.08-3P
L1: library part 7447021, "FIXED IND 100UH 2A 80 MOHM TH", Manufacturer="Wurth Electronics", Supplier Part Number=710-7447021, ComponentLink1Description=https://datasheet.ciiva.com/11796/0900766b804e2e89-11796539.pdf?src-supplier=Rs, ComponentLink1URL=https://datasheet.ciiva.com/11796/0900766b804e2e89-11796539.pdf?src-supplier=Rs, ComponentLink2Description=https://datasheet.ciiva.com/6693/7447021-6693538.pdf?src-supplier=Digikey, ComponentLink2URL=https://datasheet.ciiva.com/6693/7447021-6693538.pdf?src-supplier=Digikey, ComponentLink3Description=https://datasheet.ciiva.com/14101/pk7447021-data-de-14101850.pdf?src-supplier=Distrelec, ComponentLink3URL=https://datasheet.ciiva.com/14101/pk7447021-data-de-14101850.pdf?src-supplier=Distrelec, ComponentLink4Description=https://datasheet.ciiva.com/7695/7447021-7695676.pdf?src-supplier=Element14, ComponentLink4URL=https://datasheet.ciiva.com/7695/7447021-7695676.pdf?src-supplier=Element14, ComponentLink5Description=https://datasheet.ciiva.com/48691/001087627-da-01-ml-we-fi-funkentstoerdrossel-7447021-de-en-48691575.pdf?src-supplier=Conrad, ComponentLink5URL=https://datasheet.ciiva.com/48691/001087627-da-01-ml-we-fi-funkentstoerdrossel-7447021-de-en-48691575.pdf?src-supplier=Conrad, Item Type=Inductors, Manufacturer Part Number=7447021, Pricing="1=1.93, 10=1.83, 50=1.71, 100=1.61, 1000=1.46, 10000=1.46 (USD)", RoHS=Yes, Stock=1392, Supplier=Mouser
L2: library part 760801401, "FIXED IND 118UH 13.9A 0.022OHM", Manufacturer="Wurth Electronics", Supplier Part Number=732-760801401-ND, Item Type=Inductors, Manufacturer Part Number=760801401, Pricing="1=18.9, 5=17.01, 10=15.12, 20=14.175, 100=13.2301 (USD)", RoHS=No, Stock=36, Supplier=Digikey
NT1: "Net Tie SMD", Manufacturer Part Number="Net Tie", Item Type="Net Tie Pad"
Q1: "MOSFET N-CH 600V 20A D2PAK", LCSC Part Number=C2688646, Manufacturer=STMicroelectronics, ComponentLink1Description=https://datasheet.ciiva.com/25625/0900766b810ea17c-25625320.pdf?src-supplier=Rs, ComponentLink1URL=https://datasheet.ciiva.com/25625/0900766b810ea17c-25625320.pdf?src-supplier=Rs, ComponentLink2Description=https://datasheet.ciiva.com/6368/cd00232934-6368742.pdf?src-supplier=Digikey, ComponentLink2URL=https://datasheet.ciiva.com/6368/cd00232934-6368742.pdf?src-supplier=Digikey, ComponentLink3Description=https://datasheet.ciiva.com/6368/cd00232934-6368743.pdf?src-supplier=Digikey, ComponentLink3URL=https://datasheet.ciiva.com/6368/cd00232934-6368743.pdf?src-supplier=Digikey, ComponentLink4Description=https://datasheet.ciiva.com/940/cd00232934-940186.pdf?src-supplier=Digikey, ComponentLink4URL=https://datasheet.ciiva.com/940/cd00232934-940186.pdf?src-supplier=Digikey, ComponentLink5Description=https://datasheet.ciiva.com/16490/cd00232934-16490237.pdf?src-supplier=Future+Electronics, ComponentLink5URL=https://datasheet.ciiva.com/16490/cd00232934-16490237.pdf?src-supplier=Future+Electronics, Item Type=MOSFETs, Manufacturer Part Number=STB26NM60N, Pricing="1=5.74, 10=3.91, 50=3.91, 100=3.5, 1000=3.49, 10000=3.49 (USD)", RoHS=Yes, Stock=642, Supplier=Mouser
Q2: "MOSFET N-CH 600V 22A TO220-3", LCSC Part Number=C537192, Manufacturer=Infineon, ComponentLink1Description=http://www.mouser.com/ds/2/196/Infineon-IPP60R099C7-DS-v02_00-EN-1076845.pdf?src-supplier=Mouser, ComponentLink1URL=http://www.mouser.com/ds/2/196/Infineon-IPP60R099C7-DS-v02_00-EN-1076845.pdf?src-supplier=Mouser, ComponentLink2Description=https://www.infineon.com/dgdl/Infineon-IPP60R099C7-DS-v02_00-EN.pdf?fileId=5546d4624cb7f111014d481216877004&src-supplier=Digikey, ComponentLink2URL=https://www.infineon.com/dgdl/Infineon-IPP60R099C7-DS-v02_00-EN.pdf?fileId=5546d4624cb7f111014d481216877004&src-supplier=Digikey, Item Type=MOSFETs, Manufacturer Part Number=IPP60R099C7XKSA1, Pricing="1=5.39, 10=4.84, 50=4.78, 100=4.69, 1000=2.27, 10000=2.27 (USD)", RoHS=Yes, Stock=617, Supplier=Mouser
Q3: "MOSFET P-CH 60V 1.6A SOT23-3", Case/Package=SOT-23-3, Continuous Drain Current (ID)=1.2A, Drain to Source Resistance=345mR, Drain to Source Voltage (Vdss)=60V, Gate to Source Voltage (Vgs)=20V, Input Capacitance=210pF, LCSC Part Number=C553975, Manufacturer="Vishay Siliconix", Max Operating Temperature=150°C, Max Power Dissipation=1.7W, Min Operating Temperature=-55°C, Package Quantity=3000, Power Dissipation=1W, Threshold Voltage=-1V, ComponentLink1Description=https://datasheet.ciiva.com/16217/si2309cd-16217597.pdf?src-supplier=Future+Electronics, ComponentLink1URL=https://datasheet.ciiva.com/16217/si2309cd-16217597.pdf?src-supplier=Future+Electronics, ComponentLink2Description=https://datasheet.ciiva.com/29742/si2309cd-29742879.pdf?src-supplier=Digikey, ComponentLink2URL=https://datasheet.ciiva.com/29742/si2309cd-29742879.pdf?src-supplier=Digikey, Drain-source On Resistance-Max=345mR, Fall Time=35ns, Height=1.02mm, Item Type=MOSFETs, Lead Free="Lead Free", Length=3.04mm, Manufacturer Part Number=SI2309CDS-T1-E3, Mounting Technology="Surface Mount", Number of Channels=1, Packaging="Tape and Reel", Pins=3, Polarity=P-CHANNEL, Pricing="1=0.53, 10=0.453, 50=0.453, 100=0.316, 1000=0.2, 10000=0.157 (USD)", Radiation Hardening=No, Rds On Max=345mR, Rise Time=35ns, RoHS=Yes, RoHS Compliant=Yes, Series=TrenchFET®, Stock=57582, Supplier=Mouser, Turn-Off Delay Time=15ns, Turn-On Delay Time=40ns, Weight=0.050717oz, Width=1.4mm
Q4: "TRANS NPN 40V 0.6A SOT23-3", LCSC Part Number=C151826, Manufacturer=Diodes, ComponentLink1Description=https://datasheet.ciiva.com/15139/getdatasheetpartid-91436-15139165.pdf?src-supplier=Verical, ComponentLink1URL=https://datasheet.ciiva.com/15139/getdatasheetpartid-91436-15139165.pdf?src-supplier=Verical, ComponentLink2Description=https://datasheet.ciiva.com/972/ds30039-972547.pdf?src-supplier=Digikey, ComponentLink2URL=https://datasheet.ciiva.com/972/ds30039-972547.pdf?src-supplier=Digikey, ComponentLink3Description=https://datasheet.ciiva.com/972/ds30039-972548.pdf?src-supplier=Digikey, ComponentLink3URL=https://datasheet.ciiva.com/972/ds30039-972548.pdf?src-supplier=Digikey, ComponentLink4Description=https://datasheet.ciiva.com/972/ds30039-972549.pdf?src-supplier=Digikey, ComponentLink4URL=https://datasheet.ciiva.com/972/ds30039-972549.pdf?src-supplier=Digikey, ComponentLink5Description=https://datasheet.ciiva.com/11201/ds30039-11201820.pdf?src-supplier=Avnet, ComponentLink5URL=https://datasheet.ciiva.com/11201/ds30039-11201820.pdf?src-supplier=Avnet, ComponentLink6Description=https://datasheet.ciiva.com/16199/ds30039-16199054.pdf?src-supplier=Future+Electronics, ComponentLink6URL=https://datasheet.ciiva.com/16199/ds30039-16199054.pdf?src-supplier=Future+Electronics, Item Type=BJTs, Manufacturer Part Number=MMBT4401-7-F, Pricing="3000=0.0119, 12000=0.0113, 30000=0.011, 75000=0.0107, 120000=0.0102 (USD)", RoHS=Yes, Stock=1359000, Supplier="Future Electronics"
Q5 Q7: "MOSFET N-CH 80V 100A 8VSON", LCSC Part Number=C2864118, Manufacturer="Texas Instruments", Package="8-VSON-CLIP (5x6)", ComponentLink1Description=LCSC, ComponentLink1URL=https://jlcpcb.com/partdetail/TexasInstruments-CSD19502Q5B/C2864118, Item Type=Mosfet, Manufacturer Part Number=CSD19502Q5B
Q6: "TRANS NPN 60V 3A SOT223-3", Case/Package=SOT-223, Clock Frequency=175MHz, Collector Base Voltage (VCBO)=80V, Collector Emitter Breakdown Voltage=60V, Collector Emitter Saturation Voltage=430mV, Collector-emitter Voltage-Max=600mV, Continuous Collector Current=3A, Emitter Base Voltage (VEBO)=5V, LCSC Part Number=C24098, Manufacturer="Diodes Zetex", Max Operating Temperature=150°C, Max Power Dissipation=2W, Min Operating Temperature=-55°C, Package Quantity=1, Collector Emitter Voltage (VCEO)=60V, ComponentLink1Description=https://datasheet.ciiva.com/5782/73067-5782650.pdf?src-supplier=Farnell, ComponentLink1URL=https://datasheet.ciiva.com/5782/73067-5782650.pdf?src-supplier=Farnell, ComponentLink2Description=https://datasheet.ciiva.com/8029/73067-8029643.pdf?src-supplier=Element14, ComponentLink2URL=https://datasheet.ciiva.com/8029/73067-8029643.pdf?src-supplier=Element14, ComponentLink3Description=https://datasheet.ciiva.com/4723/fzt651-4723319.pdf?src-supplier=Mouser, ComponentLink3URL=https://datasheet.ciiva.com/4723/fzt651-4723319.pdf?src-supplier=Mouser, ComponentLink4Description=https://datasheet.ciiva.com/975/fzt651-975544.pdf?src-supplier=Digikey, ComponentLink4URL=https://datasheet.ciiva.com/975/fzt651-975544.pdf?src-supplier=Digikey, Current=3A, Current Rating=3A, Frequency=175MHz, Gain Bandwidth Product=175MHz, Height=1.65mm, hFE Min=100, Item Type=BJTs, Lead Free="Lead Free", Length=6.7mm, Manufacturer Part Number=FZT651TA, Max Breakdown Voltage=60V, Max Collector Current=3A, Mounting Technology="Surface Mount", Number of Elements=1, Packaging="Tape and Reel", Pins=4, Polarity=NPN, Power Dissipation=2W, Pricing="1000=0.265, 3000=0.255, 4000=0.25, 10000=0.245, 15000=0.24 (USD)", Radiation Hardening=No, Reach SVHC Compliant=No, RoHS=Yes, RoHS Compliant=Yes, Series=-, Stock=670000, Supplier="Future Electronics", Termination=SMD/SMT, Transition Frequency=175MHz, Voltage=60V, Voltage Rating (DC)=60V, Weight=0.000282oz, Width=3.7mm
R1 R4: library part RC1206FR-073M09L, "RES 3.09M OHM 1% 1/4W 1206", Case Code (Imperial)=1206, Case Code (Metric)=3216, LCSC Part Number=C488771, Manufacturer=Yageo, Max Operating Temperature=155°C, Max Power Dissipation=250mW, Min Operating Temperature=-55°C, Package Quantity=1, Temperature Coefficient=100ppm/°C, Tolerance=1%, Voltage Rating (DC)=200V, Case/Package=1206, ComponentLink1Description=https://datasheet.ciiva.com/2461/pyu-rc1206-51-rohs-l-4-2461290.pdf?src-supplier=Digikey, ComponentLink1URL=https://datasheet.ciiva.com/2461/pyu-rc1206-51-rohs-l-4-2461290.pdf?src-supplier=Digikey, ComponentLink2Description=https://datasheet.ciiva.com/2461/pyu-rc1206-51-rohs-l-4-2461291.pdf?src-supplier=Digikey, ComponentLink2URL=https://datasheet.ciiva.com/2461/pyu-rc1206-51-rohs-l-4-2461291.pdf?src-supplier=Digikey, ComponentLink3Description=https://datasheet.ciiva.com/2461/pyu-rc1206-51-rohs-l-4-2461292.pdf?src-supplier=Digikey, ComponentLink3URL=https://datasheet.ciiva.com/2461/pyu-rc1206-51-rohs-l-4-2461292.pdf?src-supplier=Digikey, Contact Plating=Tin,Matte, Features="Moisture Resistant", Height=0.026inch, Item Type=Resistor, Lead Free="Lead Free", Length=0.122inch, Manufacturer Part Number=RC1206FR-073M09L, Number of Terminations=2, Packaging="Cut Tape", Pricing="1=0.1, 10=0.025, 50=0.025, 100=0.015, 1000=0.013, 10000=0.01 (USD)", RoHS=Yes, RoHS Compliant=Yes, Series=RC, Stock=10394, Supplier=Mouser, Width=0.063inch
R2: library part RC0805FR-071ML, "RES 1M OHM 1% 1/8W 0805", Case Code (Imperial)=0805, Case Code (Metric)=2012, Case/Package=Molded, LCSC Part Number=C107700, Manufacturer=Yageo, Max Operating Temperature=155°C, Min Operating Temperature=-55°C, Power Rating=125mW, Resistance Tolerance=1%, Resistor Type="Thick Film", Supplier Part Number=7283393, Temperature Coefficient=250ppm/°C, Voltage Rating=150V, Category="Chip SMD Resistors", Construction=Rectangular, Depth=1.25mm, Item Type=Resistor, Lead Free="Lead Free", Length=2mm, Manufacturer Part Number=RC0805FR-071ML, Military Standard=Not, Packaging="Tape and Reel", Pricing="5000=0.0027, 25000=0.0025, 125000=0.0024, 500000=0.0023, 1250000=0.0021 (USD)", Reach SVHC Compliant=Unknown, RoHS=Yes, RoHS Compliant=Yes, Stock=2655000, Supplier="Future Electronics", Tolerance=1%, Voltage Rating (AC)=150V
R3 R6 R7 R10: library part RC1206FR-073M3L, "RES 3.3M OHM 1% 1/4W 1206", LCSC Part Number=C137288, Manufacturer=Yageo, Voltage Rating (AC)=200V, ComponentLink1Description=https://datasheet.ciiva.com/11809/0900766b80c6630a-11809505.pdf?src-supplier=Rs, ComponentLink1URL=https://datasheet.ciiva.com/11809/0900766b80c6630a-11809505.pdf?src-supplier=Rs, ComponentLink2Description=https://datasheet.ciiva.com/2511/pyu-rc1206-51-rohs-l-4-2511094.pdf?src-supplier=Digikey, ComponentLink2URL=https://datasheet.ciiva.com/2511/pyu-rc1206-51-rohs-l-4-2511094.pdf?src-supplier=Digikey, ComponentLink3Description=https://datasheet.ciiva.com/2511/pyu-rc1206-51-rohs-l-4-2511095.pdf?src-supplier=Digikey, ComponentLink3URL=https://datasheet.ciiva.com/2511/pyu-rc1206-51-rohs-l-4-2511095.pdf?src-supplier=Digikey, ComponentLink4Description=https://datasheet.ciiva.com/2511/pyu-rc1206-51-rohs-l-4-2511096.pdf?src-supplier=Digikey, ComponentLink4URL=https://datasheet.ciiva.com/2511/pyu-rc1206-51-rohs-l-4-2511096.pdf?src-supplier=Digikey, ComponentLink5Description=https://datasheet.ciiva.com/17420/pyu-rc1206-51-rohs-l-4-17420140.pdf?src-supplier=Future+Electronics, ComponentLink5URL=https://datasheet.ciiva.com/17420/pyu-rc1206-51-rohs-l-4-17420140.pdf?src-supplier=Future+Electronics, Item Type=Resistor, Manufacturer Part Number=RC1206FR-073M3L, Pricing="5000=0.0038, 20000=0.0036, 75000=0.0034, 200000=0.0032, 500000=0.003 (USD)", RoHS=Yes, Stock=130000, Supplier="Future Electronics"